# Altium PCB DC-Motor-Driver-v1.0.PcbDoc (part 1 of 5)
Units mil, origin at the board's own origin, x right, y up, seen from the top; angles counter-clockwise.
Board outline 1968.5 x 1574.8 mil, 4 copper layers (Top Layer, Signal 1, Signal 2, Bottom Layer), stack 62.055 mil thick; 133 components, 124 nets, 619 pads, 342 vias.
Unrouted connection lines stored in the file: 5.
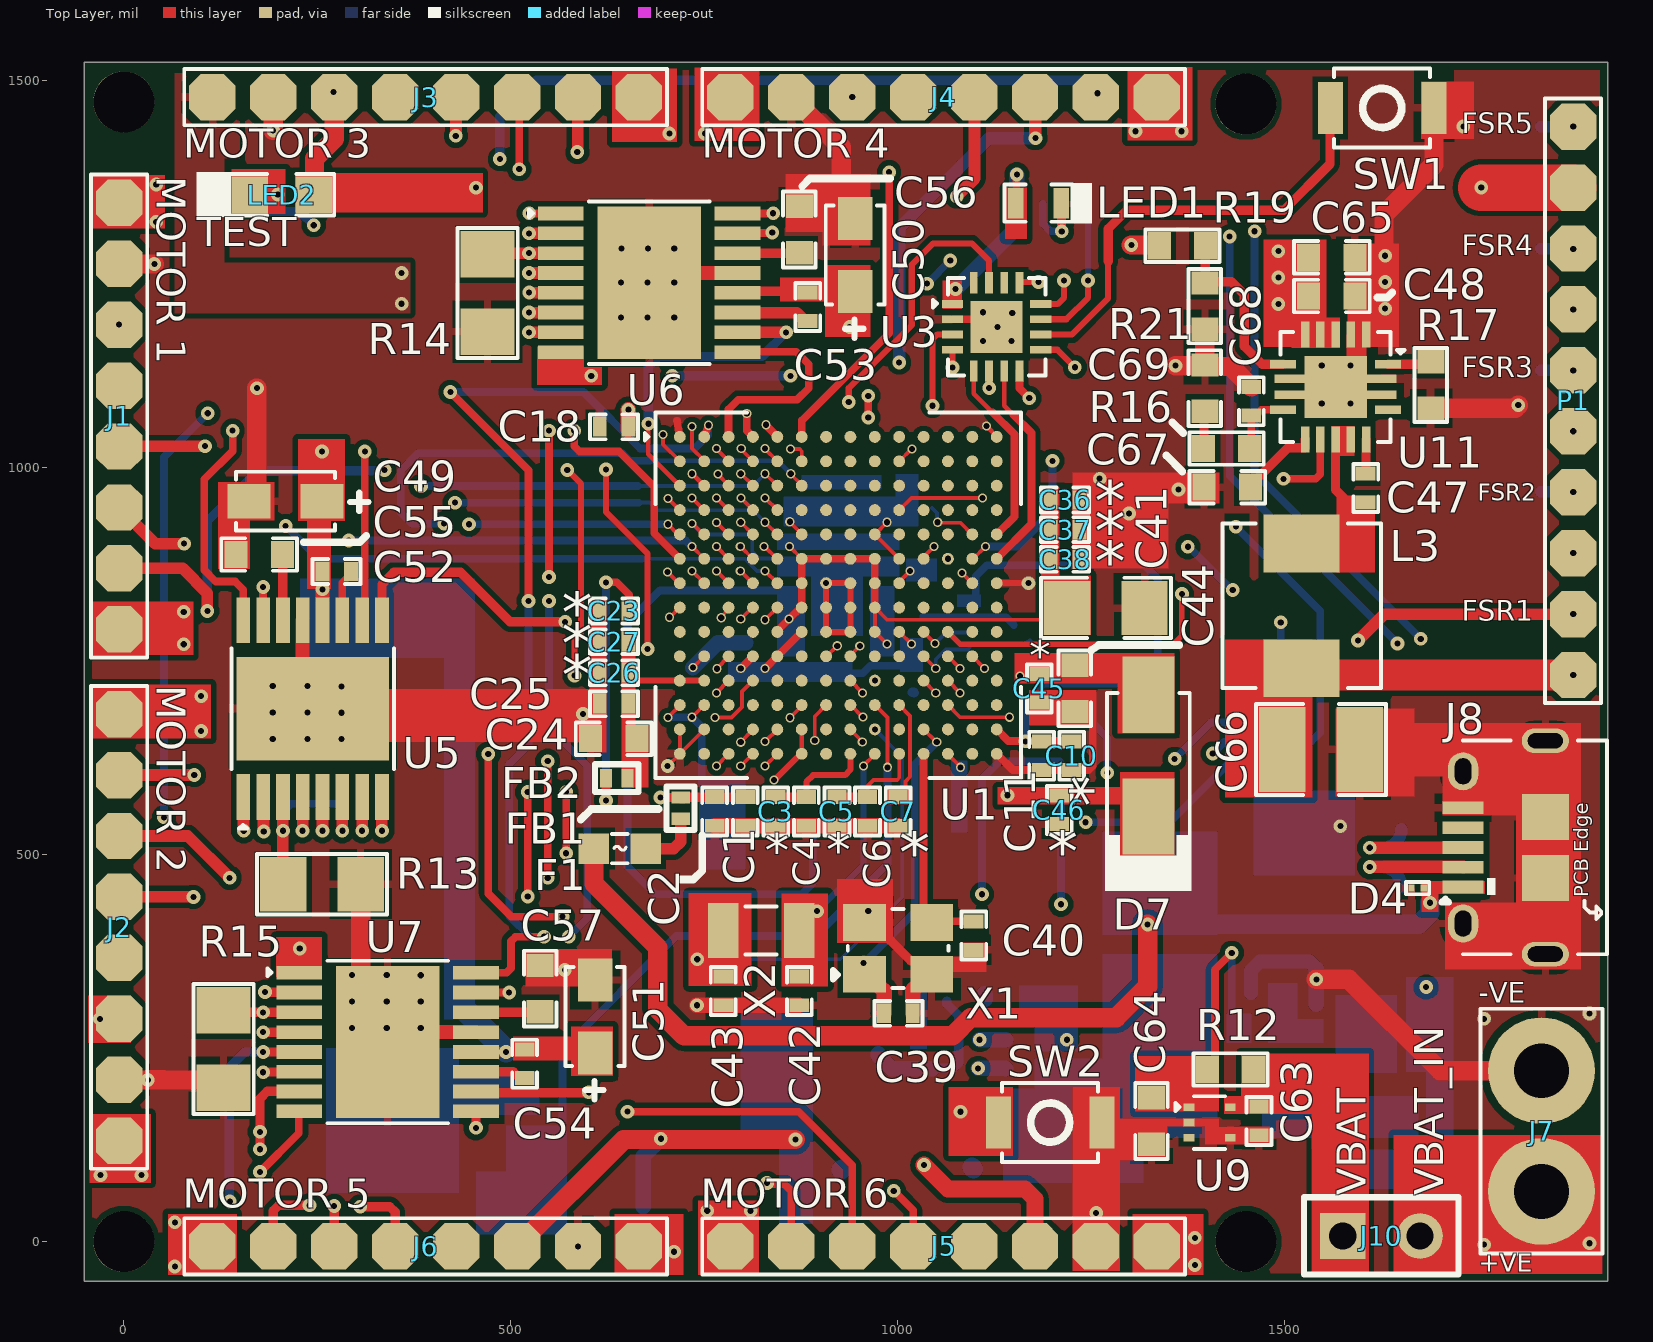
[diagram p0: Top Layer view]
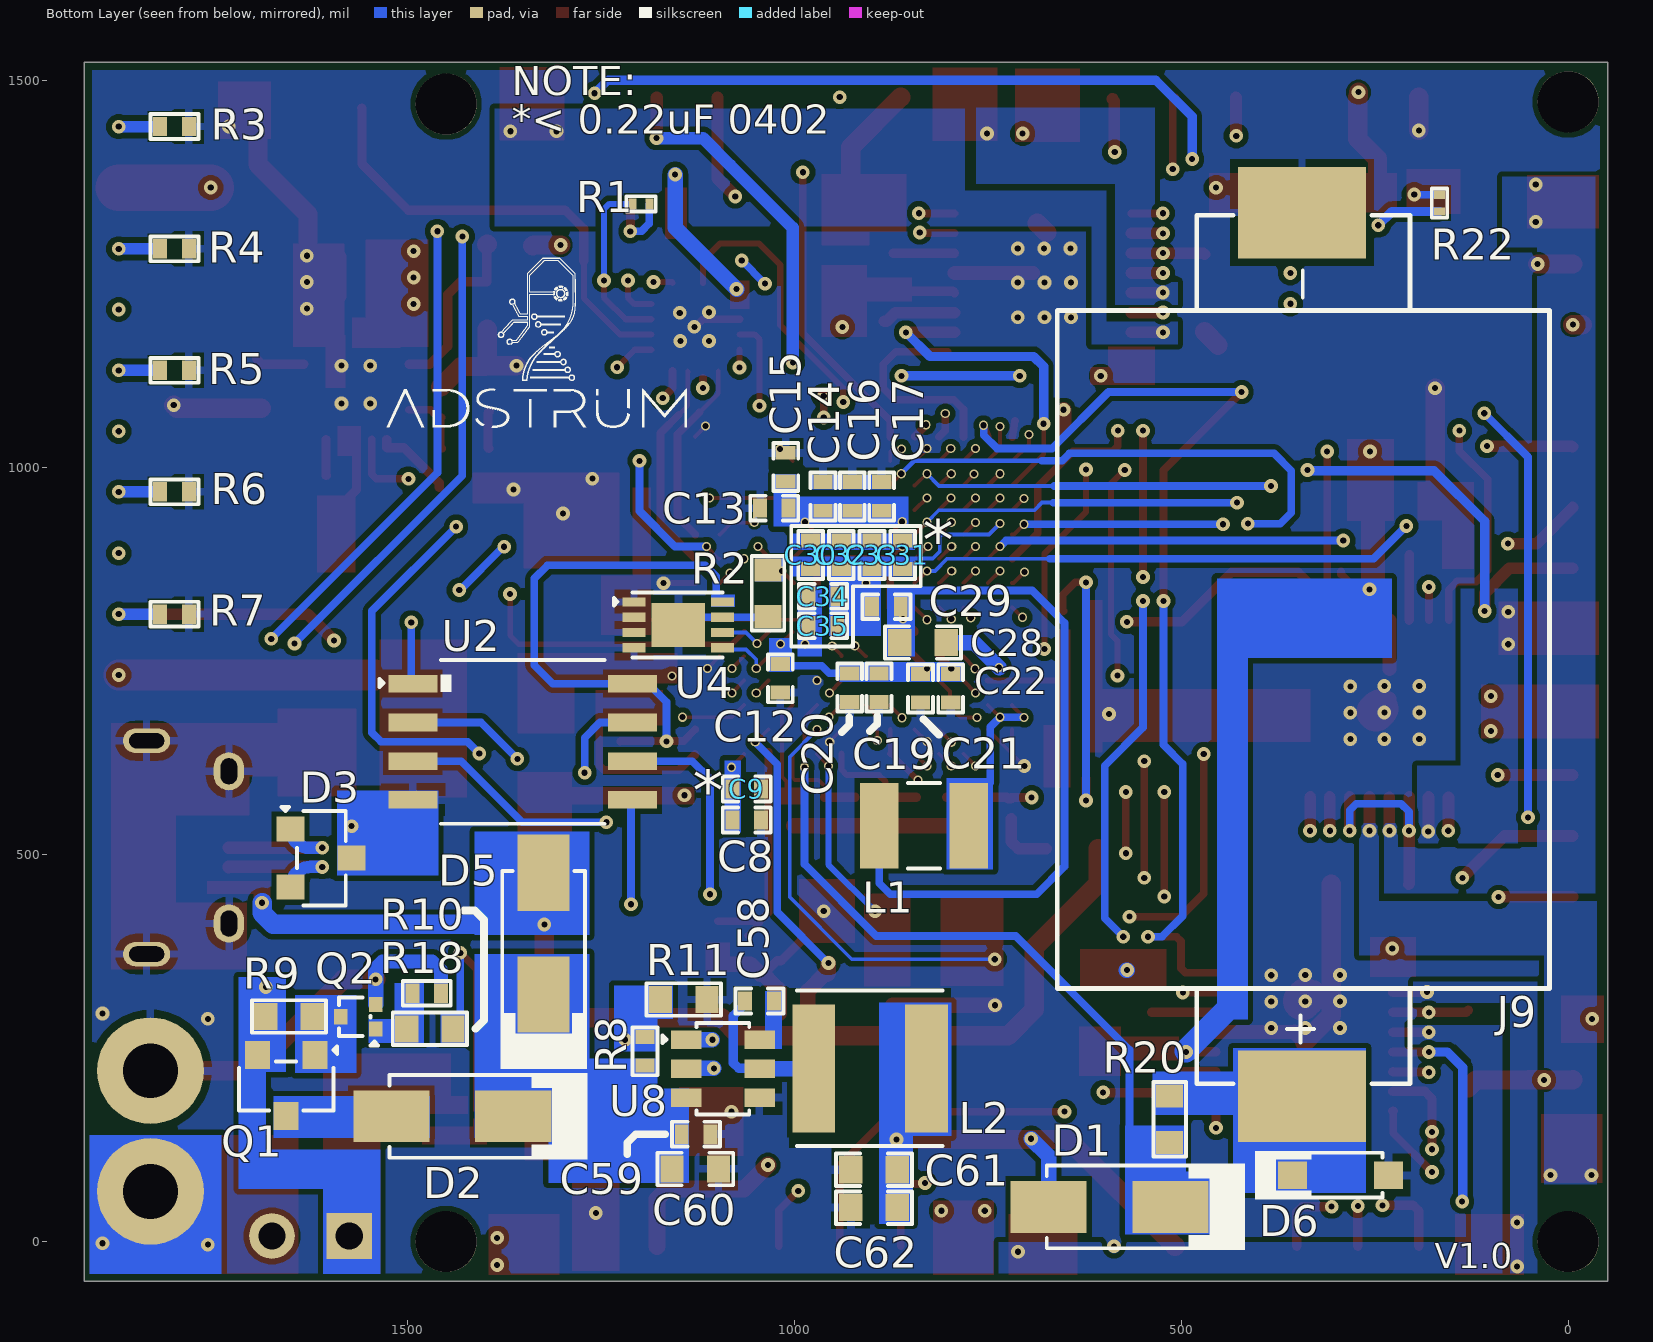
[diagram p1: Bottom Layer view, seen from below]
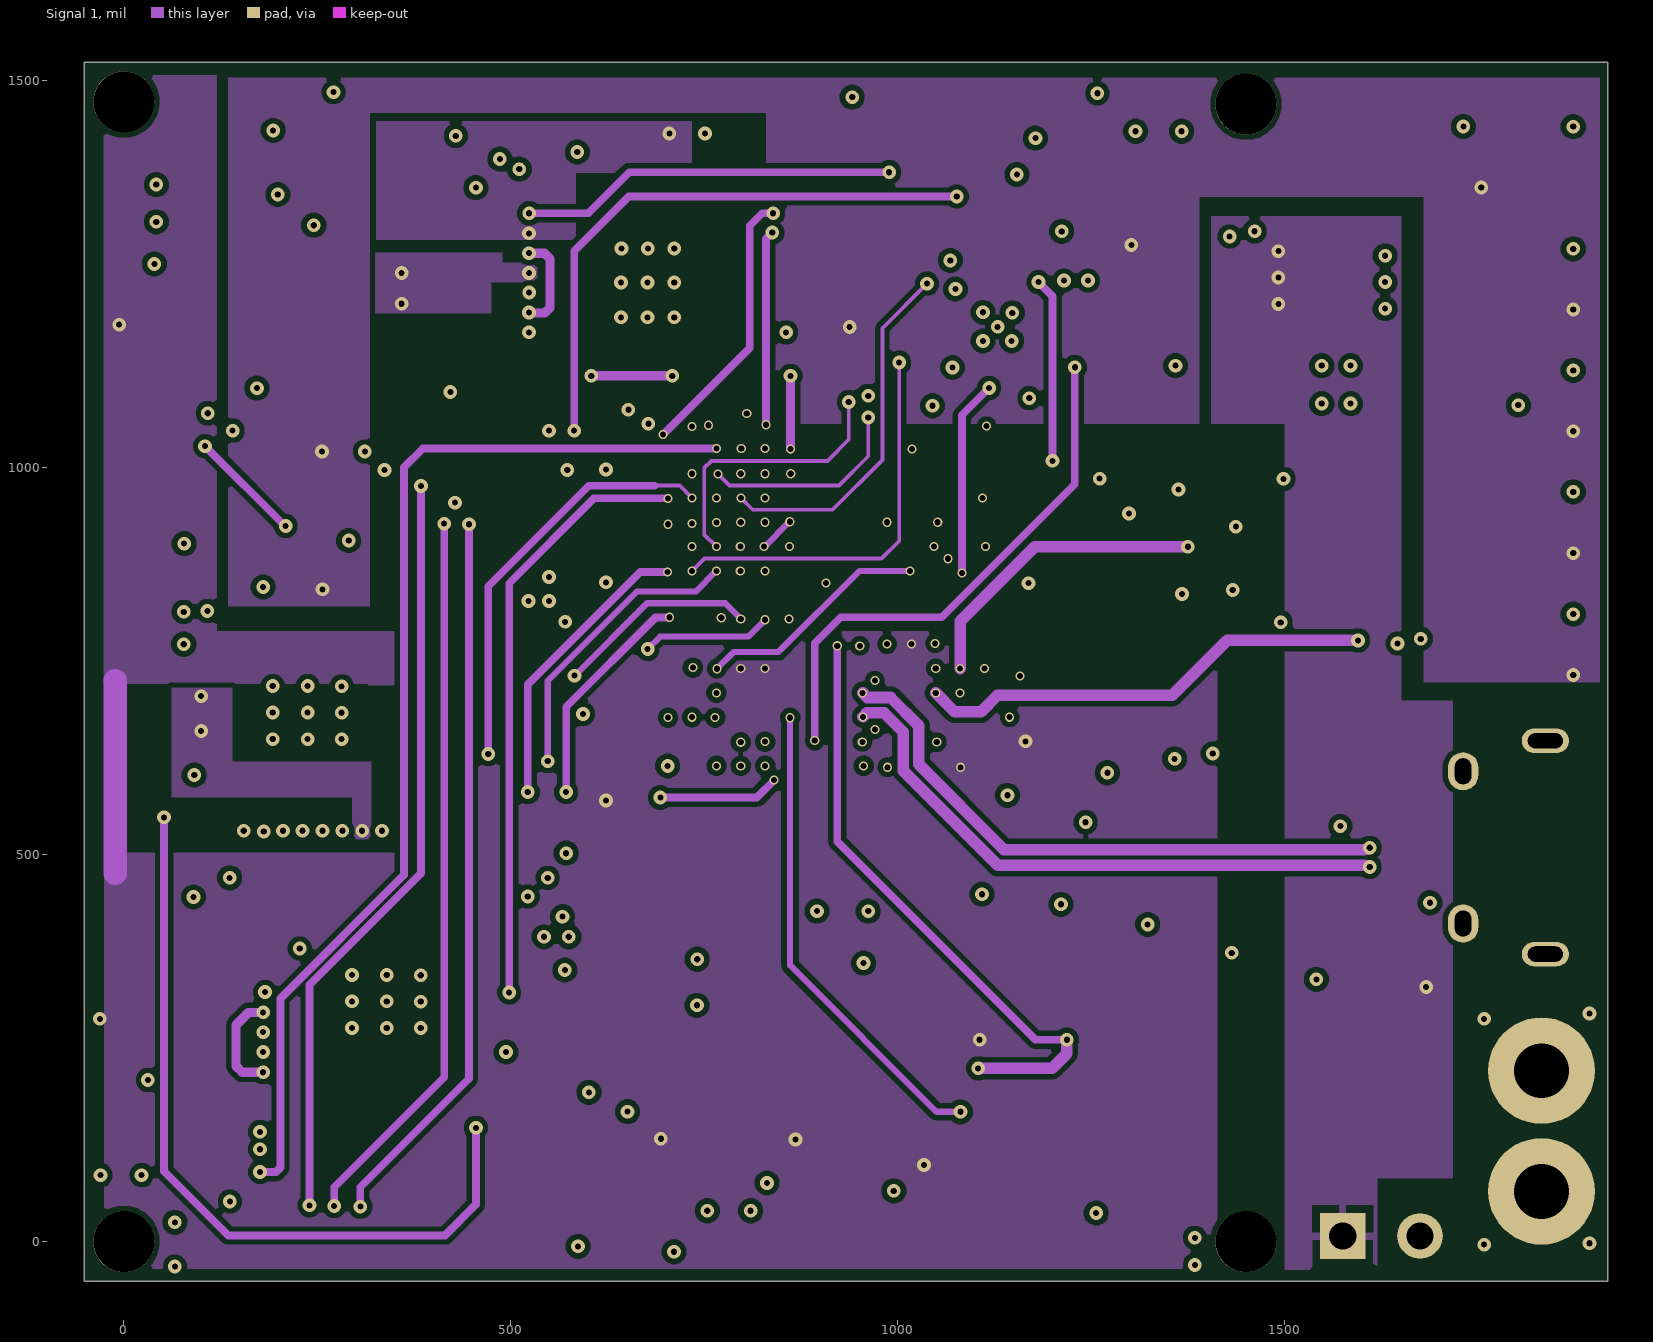
[diagram p2: Signal 1]
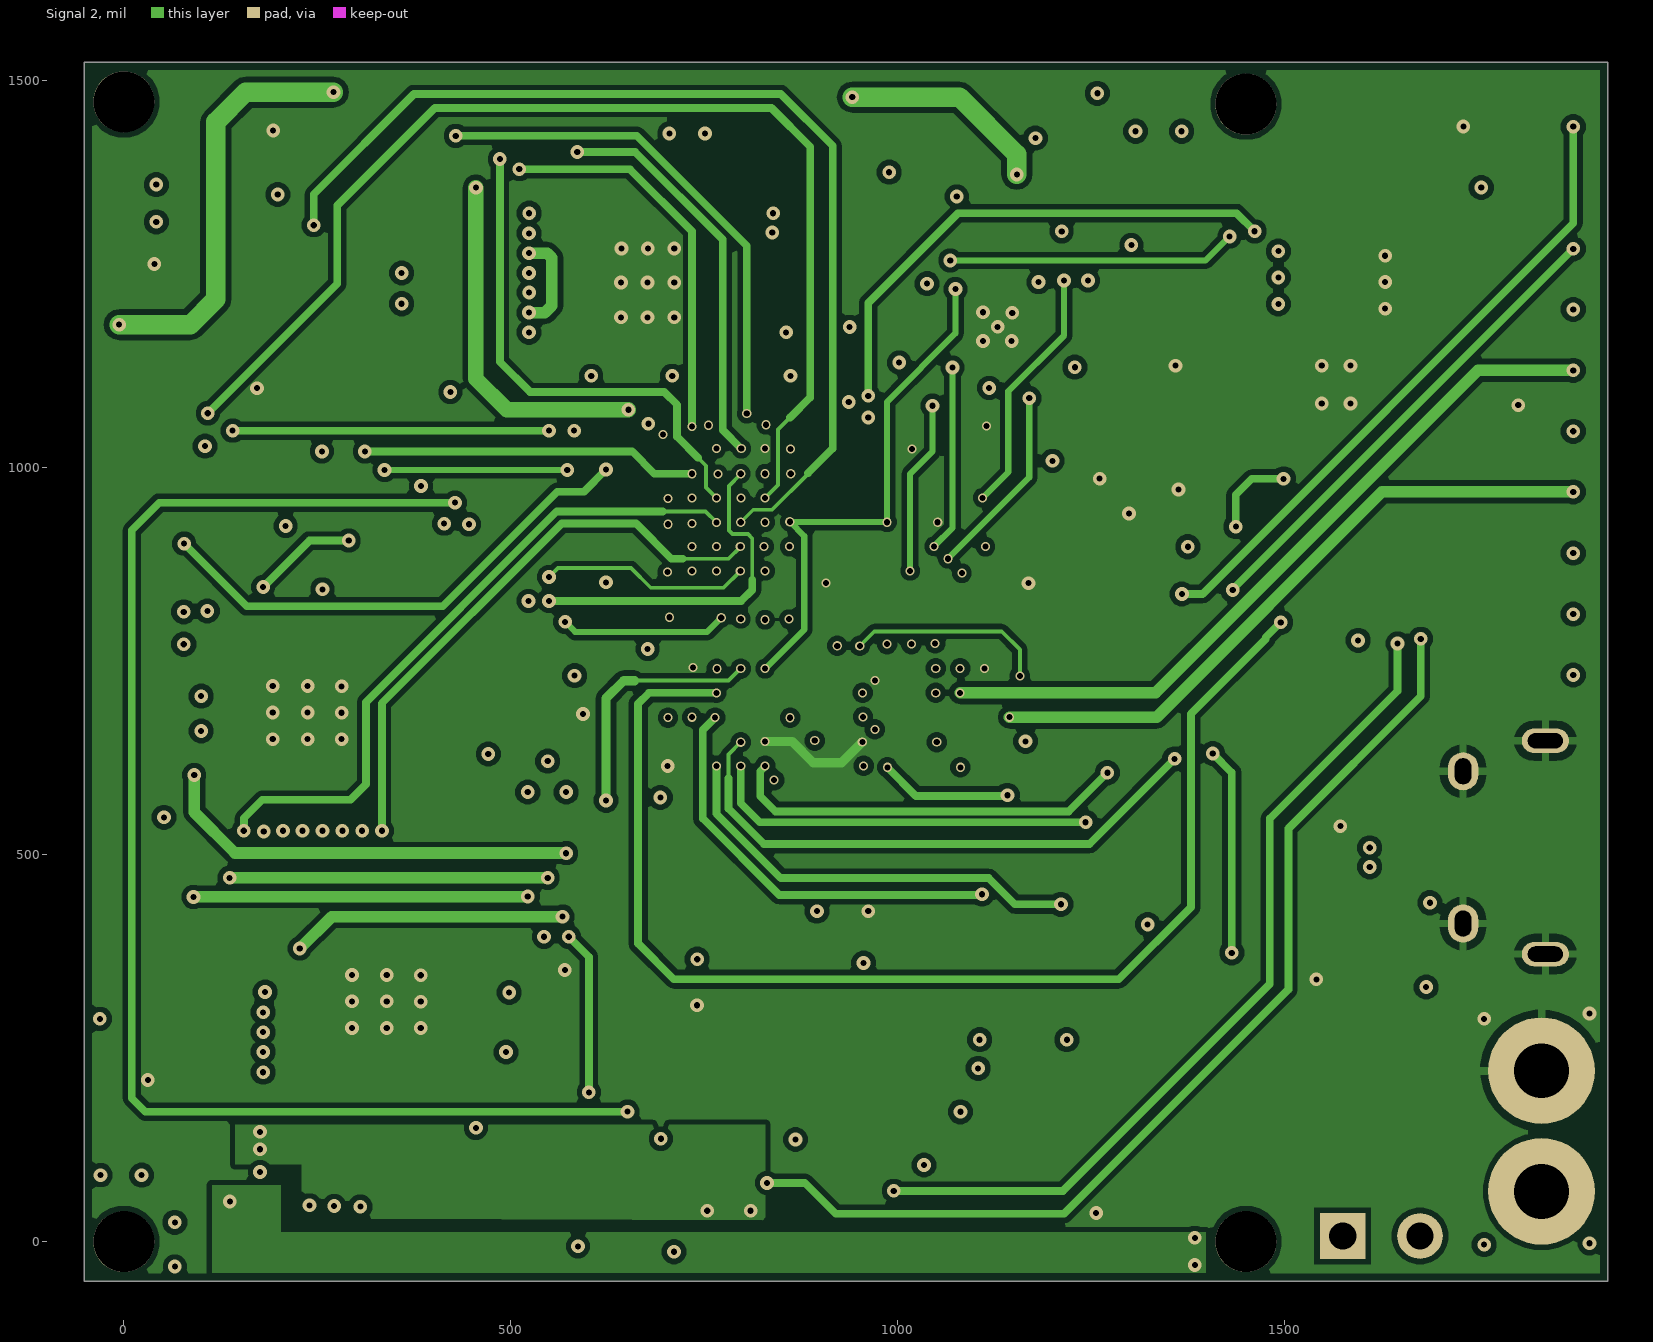
[diagram p3: Signal 2]

## Layer stack, top to bottom
Top Solder: solder mask 0.5, Solder Resist, Dk 3.5
Top Layer: signal copper 1.1811
Dielectric 2: prepreg 8.2835, PP-006, Dk 4.1
Signal 1: signal copper 0.5984
Dielectric 1: core 41.9291, FR-4, Dk 4.8
Signal 2: signal copper 0.5984
Dielectric 3: prepreg 8.2835, PP-006, Dk 4.1
Bottom Layer: signal copper 1.1811
Bottom Solder: solder mask 0.5, Solder Resist, Dk 3.5

## Board outline
-51,-50.8 -51,1524 1917.5,1524 1917.5,-50.8

## Design rules (kind name [scope] priority, off if disabled: settings)
BoardOutlineClearance [All] p1: gap=0 ignorepadtopadclearanceinfootprint=FALSE except(10: Poly-OutlineEdge)
Clearance Clearance_1 [All] p1: gap=7 ignorepadtopadclearanceinfootprint=FALSE except(4: Arc-Arc Arc-Track Arc-SMDPad Arc-THPad Track-Track Track-SMDPad Track-THPad SMDPad-SMDPad SMDPad-THPad THPad-THPad)
Clearance Clearance_BGA [WithinRoom('BGA')] p2: gap=3 ignorepadtopadclearanceinfootprint=FALSE
DiffPairsRouting [All] p1: maxlimit=5 minlimit=5 mostfreqgap=5 toplayer_minwidth=16 toplayer_maxwidth=16 toplayer_prefwidth=16 bottomlayer_minwidth=16 bottomlayer_maxwidth=16 bottomlayer_prefwidth=16 impedanceprofiledriven=TRUE impedanceprofileid={C171A0CF-75CA-4105-AF21-8C6E3F260B6E} impedanceprofilevalue=90.000000 maxuncoupledlength=500
HoleToHoleClearance [All] p1: gap=0 allowstackedmicrovias=TRUE
MatchedLengths "Schematic Matched Net Lengths" [InNetClass('GSM_USB')] p1: tolerance=50 checknetsindiffpair=TRUE checkdiffpairvsdiffpair=FALSE checkxsignals=FALSE checkothers=FALSE
MaxMinImpedance "Schematic Impedance Constraint" [InNetClass('GSM_USB')] p1: minimum=85.00 maximum=90.00
MinimumSolderMaskSliver [All] p1: minsoldermaskwidth=0
PolygonConnect [All] p1: thpad.connectstyle=Relief thpad.reliefconductorwidth=10 thpad.reliefentries=4 thpad.polygonreliefangle="90 Angle" thpad.airgapwidth=10 smdpad.connectstyle=Relief smdpad.reliefconductorwidth=10 smdpad.reliefentries=4 smdpad.polygonreliefangle="90 Angle" smdpad.airgapwidth=10 via.connectstyle=Direct via.reliefconductorwidth=10 via.reliefentries=4 via.polygonreliefangle="90 Angle" via.airgapwidth=10
RoutingVias RoutingVias_BGA [WithinRoom('BGA')] p1: holewidth=7.87 width=11.81 viastyle="Through Hole" minholewidth=7.87 minwidth=11.81 maxholewidth=7.87 maxwidth=11.81
RoutingVias [All] p2: holewidth=7.87 width=17.72 viastyle="Through Hole" minholewidth=7.87 minwidth=17.72 maxholewidth=7.87 maxwidth=17.72
SilkToSilkClearance [All] p1: silktosilkclearance=0
SilkToSolderMaskClearance [IsPad] p1: minsilkscreentomaskgap=0 clearancetoexposedcopper=TRUE
SolderMaskExpansion [All] p1: expansion=4 istentingtop=FALSE
Width [All] p1: maxlimit=100 minlimit=5 preferedwidth=10 minimp=50.000000 maximp=50.000000 favimp=50.000000
Width Width_BGA [WithinRoom('BGA')] p2: maxlimit=5 minlimit=3 preferedwidth=3 toplayer_prefwidth=5 midlayer1_maxwidth=3 midlayer2_maxwidth=3 bottomlayer_maxwidth=3 minimp=50.000000 maximp=50.000000 favimp=50.000000
25 further rules are at their usual default settings.

## Classes and differential pairs
differential pair class GSM_USB_Lines: USB_D
net class GSM_USB: USB_D_N USB_D_P
component class Power_Section: C47 C48 C58 C59 C60 C61 C62 C63 C64 C65 C66 C67 C68 C69 D2 D3 D4 D5 J7 J8 J10 L2 L3 Q1 Q2 R8 R9 R10 R11 R12 R16 R17 R18 R19 R21 U8 U9 U11
component class Motor_Section: C49 C50 C51 C52 C53 C54 C55 C56 C57 J1 J2 J3 J4 J5 J6 LED2 P1 R3 R4 R5 R6 R7 R13 R14 R15 R22 U5 U6 U7
component class Controller_Section: C1 C2 C3 C4 C5 C6 C7 C8 C9 C10 C11 C12 C13 C14 C15 C16 C17 C18 C19 C20 C21 C22 C23 C24 C25 C26 C27 C28 C29 C30 C31 C32 C33 C34 C35 C36 C37 C38 C39 C40 C41 C42 C43 C44 C45 C46 D1 D6 D7 F1 FB1 FB2 J9 L1 LED1 R1 R2 R20 SW1 SW2 U1 U2 U3 U4 X1 X2
differential pair USB_D: +USB_D_P -USB_D_N

## Components (designator, comment, footprint, x,y, rotation, side; value= is the part's Value field where it differs from the comment)
C1 "1uF" Cap-0402 803.04,556 r90 top locked
C2 "1uF" Cap-0402 763.54,556 r90 top locked
C3 "0.22uF" Cap-0402 842.54,556 r90 top locked
C4 "4.7uF" Cap-0402 882.04,556 r90 top locked
C5 "0.22uF" Cap-0402 921.54,556 r90 top locked
C6 "4.7uF" Cap-0402 961.04,556 r90 top locked
C7 "0.22uF" Cap-0402 1000.54,556 r90 top locked
C8 "4.7uF" Cap-0402 1061.5,545 r0 bottom locked
C9 "0.22uF" Cap-0402 1061.5,585 r0 bottom locked
C10 "0.22uF" Cap-0402 1225,628 r90 top locked
C11 "1uF" Cap-0402 1186,628 r90 top locked
C12 "0.1uF" Cap-0402 1018,728 r90 bottom locked
C13 "0.1uF" Cap-0402 1026,948 r180 bottom locked
C14 "0.1uF" Cap-0402 963,963 r270 bottom locked
C15 "4.7uF" Cap-0402 1011,1001 r270 bottom locked
C16 "0.1uF" Cap-0402 925.11,963 r270 bottom locked
C17 "0.1uF" Cap-0402 887.23,963 r270 bottom locked
C18 "4.7uF" Cap-0402 633.54,1053 r0 top locked
C19 "0.1uF" Cap-0402 890.61,716 r90 bottom locked
C20 "4.7uF" Cap-0402 928.46,716 r90 bottom locked
C21 "0.1uF" Cap-0402 837,715 r90 bottom locked
C22 "4.7uF" Cap-0402 798.03,715 r90 bottom locked
C23 "0.22uF" Cap-0402 633.54,815 r0 top locked
C24 "22uF" Cap-0603 633,650 r0 top locked
C25 "4.7uF" Cap-0402 633.54,695 r180 top locked
C26 "0.22uF" Cap-0402 633.54,735.1 r0 top locked
C27 "0.22uF" Cap-0402 633.54,775.2 r0 top locked
C28 "22uF" Cap-0603 833.78,774.24 r0 bottom locked
C29 "4.7uF" Cap-0402 881.02,820.49 r0 bottom locked
C30 "0.22uF" Cap-0402 979,887.5 r90 bottom locked
C31 "0.22uF" Cap-0402 860,887.5 r90 bottom locked
C32 "0.22uF" Cap-0402 939.33,887.5 r90 bottom locked
C33 "0.22uF" Cap-0402 899.67,887.5 r90 bottom locked
C34 "0.22uF" Cap-0402 962.99,834.01 r0 bottom locked
C35 "0.22uF" Cap-0402 962.99,796.01 r0 bottom locked
C36 "0.22uF" Cap-0402 1216.37,958.49 r180 top locked
C37 "0.22uF" Cap-0402 1216.37,920.06 r180 top locked
C38 "0.22uF" Cap-0402 1216.37,881.63 r180 top locked
C39 "12pF" Cap-0402 1001,295 r0 top locked
C40 "12pF" Cap-0402 1098.54,395.5 r270 top locked
C41 "33uF" Cap-1206 1269,819 r180 top locked
C42 "12pF" Cap-0402 873.04,324 r270 top locked
C43 "12pF" Cap-0402 774.54,324 r270 top locked
C44 "10uF" Cap-0603 1229,715 r90 top locked
C45 "0.22uF" Cap-0402 1183,715 r90 top locked
C46 "0.22uF" Cap-0402 1209,558 r90 top locked
C47 "0.1uF" Cap-0402 1605,974 r90 top locked
C48 "10uF" Cap-0603 1561,1222 r180 top locked
C49 "10uF" Case-A 209,957 r180 top locked
C50 "10uF" Case-A 945,1275 r90 top locked
C51 "10uF" Case-A 609,291 r90 top locked
C52 "0.01uF" Cap-0402 275,866 r180 top locked
C53 "0.01uF" Cap-0402 884,1208 r90 top locked
C54 "0.01uF" Cap-0402 518,230 r90 top locked
C55 "2.2uF" CAP-0603 175,888 r0 top locked
C56 "2.2uF" CAP-0603 873,1308 r270 top locked
C57 "2.2uF" CAP-0603 538,327 r270 top locked
C58 "0.1uF" Cap-0402 1045,311 r180 bottom locked
C59 "0.1uF" Cap-0402 1127,139 r0 bottom locked
C60 "10uF" Cap-0603 1128,94 r0 bottom locked
C61 "22uF" Cap-0603 897,93 r180 bottom locked
C62 "22uF" Cap-0603 897,44 r180 bottom locked
C63 "1uF" Cap-0402 1467,156 r90 top locked
C64 "1nF" CAP-0603 1328,156 r90 top locked
C65 "4.7uF" Cap-0603 1561,1272 r180 top locked
C66 "47uF" Cap-1210 1547,636 r180 top locked
C67 "2.2nF" Cap-0603 1426,975 r0 top locked
C68 "33pF" Cap-0402 1457,1086 r270 top locked
C69 "22nF" Cap-0603 1397,1103 r270 top locked
D1 "SS16" SMA 592.74,45 r0 bottom locked
D2 "SS36" SMA 1442,162 r0 bottom locked
D3 "ESD5302F-3/TR" Sot-23 1611.63,495.6 r270 bottom locked
D4 "PESD5V0H1BSFYL" DSN0603-2 1672,457 r0 top locked
D5 "SS36" SMA 1324,398 r90 bottom locked
D6 "LBZT52B3V0T1G" SOD-123 294,86 r0 bottom locked
D7 "SS16" SMA 1324,628 r90 top locked
F1 "SMD0603-050" Fuse-0603 641,508 r0 top locked
FB1 "BLM15PD121SN1D" IND-0402 719.54,560.22 r90 top locked
FB2 "BLM15PD121SN1D" IND-0402 637,599 r0 top locked
J1 "SMD PADS (1x8) 2.54mm" "SMD PADS (1X8) 2.54MM" -6,1342.48 r270 top locked
J2 "SMD PADS (1x8) 2.54mm" "SMD PADS (1X8) 2.54MM" -6,130.56 r90 top locked
J3 "SMD PADS (1x8) 2.54mm" "SMD PADS (1X8) 2.54MM" 114.52,1479 r0 top locked
J4 "SMD PADS (1x8) 2.54mm" "SMD PADS (1X8) 2.54MM" 783.82,1479 r0 top locked
J5 "SMD PADS (1x8) 2.54mm" "SMD PADS (1X8) 2.54MM" 1335,-6 r180 top locked
J6 "SMD PADS (1x8) 2.54mm" "SMD PADS (1X8) 2.54MM" 665.7,-6 r180 top locked
J7 "DNP" "Through Hole Pads 2" 1832,142.95 r90 top locked
J8 "10118194-0001LF" 10118194-0001LF_ 1730.7,509.44 r90 top locked
J9 "CR2032-BS-6-1" CR2032-BS-6-1 344,759 r270 bottom locked
J10 "826629-2" HDR1X2_ 1575,7.39 r0 top locked
L1 "4.7uH" IND-1210 832.46,537.5 r180 bottom locked
L2 "3.9uH" SWPA5020S3R9NT 902.13,224 r180 bottom locked
L3 "2.2uH" PSPMAA0503-2R2M-ANP 1522,821.61 r270 top locked
LED1 "RED" LED-0603 1182,1342 r0 top locked
LED2 "Orange" LED-0805 204,1353 r180 top locked
P1 "SMD PADS (1x10) 2.54mm" "SMD PADS (1x10) 2.54mm" 1768,799.26 r90 top locked
Q1 "AO3407" SOT-23 1656.6,201.63 r0 bottom locked
Q2 "MMBT3904M" SOT-723 1563.64,290.75 r90 bottom locked
R1 "470R" Res-0201 1198.17,1341 r0 bottom locked
R2 "100K" Res-0603 1034,838 r90 bottom locked
R3 "2.87k" Res-0402 1801,1441 r0 bottom locked
R4 "2.87k" Res-0402 1801,1283 r0 bottom locked
R5 "2.87k" Res-0402 1801,1126 r0 bottom locked
R6 "2.87k" Res-0402 1801,969 r0 bottom locked
R7 "2.87k" Res-0402 1801,811 r0 bottom locked
R8 "10K" Res-0402 1193,246 r270 bottom locked
R9 "1K" Res-0603 1653,291 r180 bottom locked
R10 "4.7K" Res-0603 1471,275 r0 bottom locked
R11 "4.7K" Res-0603 1143,313 r0 bottom locked
R12 "4.7K" Res-0603 1430.25,222.45 r0 top locked
R13 "330mR" Res-1206 256,462 r180 top locked
R14 "330mR" Res-1206 470,1226 r90 top locked
R15 "330mR" Res-1206 129,249 r90 top locked
R16 "3.9K" Res-0603 1425,1025 r0 top locked
R17 "56K" Res-0603 1689,1107 r90 top locked
R18 "10K" Res-0402 1475,321 r0 bottom locked
R19 "649K" Res-0603 1368,1287 r180 top locked value=649kR
R20 "100R" Res-0603 514.97,158.13 r90 bottom locked
R21 "100K" Res-0603 1397,1209 r90 top locked
R22 "470R" Res-0201 166.32,1342.14 r90 bottom locked
SW1 "B3U-1000P" B3U-1000P 1626.07,1465 r180 top locked
SW2 "B3U-1000P" B3U-1000P 1197,154 r180 top locked
U1 "MIMXRT1062DVJ6B" "196-LFBGA (12x12)" 923.27,835.24 r0 top locked
U2 "W25Q64JVSSIM" "SOIC-8 (208 mil)" 1351,646 r180 bottom locked
U3 "MKL02Z32VFG4" "16-QFN (3x3)." 1127.91,1182.16 r0 top locked
U4 "M24C64-FMC6TG" DFN-8-EP(2x3) 1150,797 r180 bottom locked
U5 "DRV8833PWPR" HTSSOP-16 244,688.83 r90 top locked
U6 "DRV8833PWPR" HTSSOP-16 678.83,1239 r0 top locked
U7 "DRV8833PWPR" HTSSOP-16 340.83,258 r0 top locked
U8 "AP63203WU-7" TSOT-23-6 1092.24,223.4 r180 bottom locked
U9 "BD4860FVE-TR" "VSOF 5" 1403,154 r0 top locked
U11 "TPS54620RHLR" "14-VQFN (3.5X3.5)_" 1565.91,1104.47 r270 top locked
X1 "24MHZ" X322524MOB4SI- 1000.54,379 r0 top locked
X2 "32.7680KHZ" NX3215SA-32.768K-STD-MUA-8_ 823.54,402 r0 top locked

## Footprints (in the part's own frame and the unit in brackets; to place one, negate y for a bottom-side part, rotate by r counter-clockwise, add the part's x,y. Pads: shape width x height; smd on the part's side, far side on the other; paste and mask are expansions set on the pad)
"14-VQFN (3.5X3.5)_" [mm]
  rect 0.28x0.85 smd: 1(-0.75,1.725) 7(-0.75,-1.725) 8(0.75,-1.725) 14(0.75,1.725)
  rect 0.85x0.28 smd: 2(-1.725,1) 3(-1.725,0.5) 4(-1.725,0) 5(-1.725,-0.5) 6(-1.725,-1) 9(1.725,-1) 10(1.725,-0.5) 11(1.725,0) 12(1.725,0.5) 13(1.725,1)
  rect 0.28x1 smd mask+0.055: 15(-0.267,1.5) 15(-0.267,-1.5) 15(0.254,1.499) 15(0.254,-1.499)
  rect 2.05x2.05 smd: 15(0,0)
  silkscreen extent -1.8,-1.8 1.8,2.26, body extent -1.75,-1.75 1.75,1.75, height 1
"16-QFN (3x3)." [mm]
  rect 0.7x0.25 smd: 1(-1.45,0.75) 2(-1.45,0.25) 3(-1.45,-0.25) 4(-1.45,-0.75) 9(1.45,-0.75) 10(1.45,-0.25) 11(1.45,0.25) 12(1.45,0.75)
  rect 0.25x0.7 smd: 5(-0.75,-1.45) 6(-0.25,-1.45) 7(0.25,-1.45) 8(0.75,-1.45) 13(0.75,1.45) 14(0.25,1.45) 15(-0.25,1.45) 16(-0.75,1.45)
  rect 1.7x1.7 smd: 17(0,0)
  silkscreen extent -2.08,-1.6 1.6,1.6, body extent -1.55,-1.55 1.55,1.55, height 0.99
"196-LFBGA (12x12)" [mm]
  round 0.39 smd: A1(-5.2,5.2) A2(-4.4,5.2) A3(-3.6,5.2) A4(-2.8,5.2) A5(-2,5.2) A6(-1.2,5.2) A7(-0.4,5.2) A8(0.4,5.2) A9(1.2,5.2) A10(2,5.2) A11(2.8,5.2) A12(3.6,5.2) A13(4.4,5.2) A14(5.2,5.2) B1(-5.2,4.4) B2(-4.4,4.4) B3(-3.6,4.4) B4(-2.8,4.4) B5(-2,4.4) B6(-1.2,4.4) B7(-0.4,4.4) B8(0.4,4.4) B9(1.2,4.4) B10(2,4.4) B11(2.8,4.4) B12(3.6,4.4) B13(4.4,4.4) B14(5.2,4.4) C1(-5.2,3.6) C2(-4.4,3.6) C3(-3.6,3.6) C4(-2.8,3.6) C5(-2,3.6) C6(-1.2,3.6) C7(-0.4,3.6) C8(0.4,3.6) C9(1.2,3.6) C10(2,3.6) C11(2.8,3.6) C12(3.6,3.6) C13(4.4,3.6) C14(5.2,3.6) D1(-5.2,2.8) D2(-4.4,2.8) D3(-3.6,2.8) D4(-2.8,2.8) D5(-2,2.8) D6(-1.2,2.8) D7(-0.4,2.8) D8(0.4,2.8) D9(1.2,2.8) D10(2,2.8) D11(2.8,2.8) D12(3.6,2.8) D13(4.4,2.8) D14(5.2,2.8) E1(-5.2,2) E2(-4.4,2) E3(-3.6,2) E4(-2.8,2) E5(-2,2) E6(-1.2,2) E7(-0.4,2) E8(0.4,2) E9(1.2,2) E10(2,2) E11(2.8,2) E12(3.6,2) E13(4.4,2) E14(5.2,2) F1(-5.2,1.2) F2(-4.4,1.2) F3(-3.6,1.2) F4(-2.8,1.2) F5(-2,1.2) F6(-1.2,1.2) F7(-0.4,1.2) F8(0.4,1.2) F9(1.2,1.2) F10(2,1.2) F11(2.8,1.2) F12(3.6,1.2) F13(4.4,1.2) F14(5.2,1.2) G1(-5.2,0.4) G2(-4.4,0.4) G3(-3.6,0.4) G4(-2.8,0.4) G5(-2,0.4) G6(-1.2,0.4) G7(-0.4,0.4) G8(0.4,0.4) G9(1.2,0.4) G10(2,0.4) G11(2.8,0.4) G12(3.6,0.4) G13(4.4,0.4) G14(5.2,0.4) H1(-5.2,-0.4) H2(-4.4,-0.4) H3(-3.6,-0.4) H4(-2.8,-0.4) H5(-2,-0.4) H6(-1.2,-0.4) H7(-0.4,-0.4) H8(0.4,-0.4) H9(1.2,-0.4) H10(2,-0.4) H11(2.8,-0.4) H12(3.6,-0.4) H13(4.4,-0.4) H14(5.2,-0.4) J1(-5.2,-1.2) J2(-4.4,-1.2) J3(-3.6,-1.2) J4(-2.8,-1.2) J5(-2,-1.2) J6(-1.2,-1.2) J7(-0.4,-1.2) J8(0.4,-1.2) J9(1.2,-1.2) J10(2,-1.2) J11(2.8,-1.2) J12(3.6,-1.2) J13(4.4,-1.2) J14(5.2,-1.2) K1(-5.2,-2) K2(-4.4,-2) K3(-3.6,-2) K4(-2.8,-2) K5(-2,-2) K6(-1.2,-2) K7(-0.4,-2) K8(0.4,-2) K9(1.2,-2) K10(2,-2) K11(2.8,-2) K12(3.6,-2) K13(4.4,-2) K14(5.2,-2) L1(-5.2,-2.8) L2(-4.4,-2.8) L3(-3.6,-2.8) L4(-2.8,-2.8) L5(-2,-2.8) L6(-1.2,-2.8) L7(-0.4,-2.8) L8(0.4,-2.8) L9(1.2,-2.8) L10(2,-2.8) L11(2.8,-2.8) L12(3.6,-2.8) L13(4.4,-2.8) L14(5.2,-2.8) M1(-5.2,-3.6) M2(-4.4,-3.6) M3(-3.6,-3.6) M4(-2.8,-3.6) M5(-2,-3.6) M6(-1.2,-3.6) M7(-0.4,-3.6) M8(0.4,-3.6) M9(1.2,-3.6) M10(2,-3.6) M11(2.8,-3.6) M12(3.6,-3.6) M13(4.4,-3.6) M14(5.2,-3.6) N1(-5.2,-4.4) N2(-4.4,-4.4) N3(-3.6,-4.4) N4(-2.8,-4.4) N5(-2,-4.4) N6(-1.2,-4.4) N7(-0.4,-4.4) N8(0.4,-4.4) N9(1.2,-4.4) N10(2,-4.4) N11(2.8,-4.4) N12(3.6,-4.4) N13(4.4,-4.4) N14(5.2,-4.4) P1(-5.2,-5.2) P2(-4.4,-5.2) P3(-3.6,-5.2) P4(-2.8,-5.2) P5(-2,-5.2) P6(-1.2,-5.2) P7(-0.4,-5.2) P8(0.4,-5.2) P9(1.2,-5.2) P10(2,-5.2) P11(2.8,-5.2) P12(3.6,-5.2) P13(4.4,-5.2) P14(5.2,-5.2)
  silkscreen extent -6.35,-6 6,6, body extent -6,-6 6,6, height 1.58
10118194-0001LF_ [mm]
  rect 0.42x1.35 smd: 1(-1.3,0) 2(-0.65,0) 3(0,0) 4(0.65,0) 5(1.3,0)
  rect 1.5x1.55 smd: MP1(-1,-2.7) MP2(1,-2.7)
  oval 1.25x1 hole 0.55 slot 0.85 at 0 deg: S1(-2.5,0) S2(2.5,0)
  oval 0.8x1.55 hole 0.5 slot 1.15 at 90 deg: S3(3.5,-2.7) S4(-3.5,-2.7)
  Top Layer region: 193 vertices and 0 holes, not listed, extent 2.3,-3.48 4,-1.925
  Top Layer region: 193 vertices and 0 holes, not listed, extent -4,-3.475 -2.3,-1.92
  silkscreen extent -3.51,-4.72 3.51,0.71, body extent -4.02,-5.34 4.03,0.19, height 2.69
B3U-1000P [mm] "SWITCH TACTILE SPST-NO 0.05A 12V"
  rect 0.82x1.72 smd: 1(-1.7,0) 2(1.7,0)
  silkscreen extent -1.57,-1.3 1.57,1.3, body extent -2,-1.26 2,1.24, height 1.6
Cap-0402 [mil]
  rect 18x25 smd mask+2.36: 1(-18.5,0) 2(18.5,0)
  silkscreen extent -31,-16 31,16, body extent -20,-10 20,10, height 19
Cap-0603 [mil]
  rect 30x35 smd mask+2.36: 1(-30,0) 2(30,0)
  silkscreen extent -49,-21 49,21, body extent -32,-16 31,16, height 34
CAP-0603 [mil]
  rect 30x35 smd mask+2.36: 1(-30,0) 2(30,0)
  silkscreen extent -49,-21 49,21, body extent -32,-16 31,16, height 34
Cap-1206 [mil] "SMD 1206"
  rect 60x70 smd: 1(-50,0) 2(50,0)
  silkscreen extent -84,-39 84,39, body extent -63,-31 63,32, height 39
Cap-1210 [mil] "SMD 1210"
  rect 60x110 smd: 1(-50,0) 2(50,0)
  silkscreen extent -84,-59 84,59, body extent -63,-49 63,49, height 39
Case-A [mm]
  rect 1.42x1.13 smd: 1(-1.2,0) 2(1.2,0)
  silkscreen extent -2.72,-0.97 1.63,0.97, body extent -1.6,-0.9 1.6,0.9, height 1.8
CR2032-BS-6-1 [mm]
  rect 3x4.2 smd: 1(14.5,0) 2(-14.5,0)
  silkscreen extent -14.41,-8.03 14.09,8.12, body extent -15.65,-8 15.65,8, height 5.6
DFN-8-EP(2x3) [mm]
  rect 0.75x0.3 smd: 1(-1.45,0.75) 2(-1.45,0.25) 3(-1.45,-0.25) 4(-1.45,-0.75) 5(1.45,-0.75) 6(1.45,-0.25) 7(1.45,0.25) 8(1.45,0.75)
  rect 1.75x1.45 smd: 9(0,0)
  silkscreen extent -2.11,-1.07 1.45,1.07, body extent -1.5,-1 1.5,1, height 1
DSN0603-2 [mm]
  rect 0.2x0.24 smd mask+0.055: 1(-0.2,0) 2(0.2,0)
  silkscreen extent -0.38,-0.2 0.38,0.2, body extent -0.3,-0.15 0.3,0.15, height 0.32
Fuse-0603 [mm]
  rect 1x1 smd: 1(-0.85,0) 2(0.85,0)
  silkscreen extent -0.25,-0.48 0.25,0.48, body extent -0.77,-0.42 0.78,0.43, height 0.45
HDR1X2_ [mm] "CONN HEADER VERT 2POS 2.54MM"
  rect 1.5x1.5 hole 0.9: 1(0,0)
  round 1.5 hole 0.9: 2(2.54,0)
  silkscreen extent -1.27,-1.27 3.81,1.27, body extent -1.27,-1.27 3.81,1.27, height 8.44
HTSSOP-16 [mm]
  rect 1.5x0.45 smd: 1(-2.9,2.275) 2(-2.9,1.625) 3(-2.9,0.975) 4(-2.9,0.325) 5(-2.9,-0.325) 6(-2.9,-0.975) 7(-2.9,-1.625) 8(-2.9,-2.275) 9(2.9,-2.275) 10(2.9,-1.625) 11(2.9,-0.975) 12(2.9,-0.325) 13(2.9,0.325) 14(2.9,0.975) 15(2.9,1.625) 16(2.9,2.275)
  rect 3.4x5 smd: 17(0,0)
  silkscreen extent -3.94,-2.67 1.98,2.67, body extent -3.2,-2.5 3.2,2.5, height 1.2
IND-0402 [mm]
  rect 0.4x0.6 smd: 1(-0.35,0) 2(0.35,0)
  silkscreen extent -0.71,-0.46 0.71,0.46, body extent -0.5,-0.25 0.5,0.25, height 0.25
IND-1210 [mm]
  rect 1.27x2.81 smd: 1(-1.471,0) 2(1.471,0)
  silkscreen extent -0.52,-1.4 0.52,1.4, body extent -1.6,-1.4 1.6,1.4, height 2.5
LED-0603 [mm]
  rect 0.5x1 smd: 1(-0.75,0) 2(0.75,0)
  silkscreen extent -1.12,-0.66 1.75,0.66, body extent -0.82,-0.37 0.82,0.36, height 0.68
LED-0805 [mm]
  rect 1.2x1.2 smd: 1(-1.05,0) 2(1.05,0)
  silkscreen extent -1.73,-0.74 2.79,0.74, body extent -1,-0.62 1,0.63, height 1.1
NX3215SA-32.768K-STD-MUA-8_ [mm]
  rect 1x1.8 smd: 1(-1.25,0) 2(1.25,0)
  silkscreen extent -0.51,-0.79 0.51,0.79, body extent -1.6,-0.75 1.6,0.75, height 0.8
PSPMAA0503-2R2M-ANP [mm]
  rect 1.895x2.5 smd: 1(-2.047,0) 2(2.048,0)
  silkscreen extent -2.7,-2.6 2.7,2.6, body extent -2.7,-2.6 2.7,2.6, height 3.1
Res-0201 [mm]
  rect 0.27x0.37 smd mask+0.055: 1(-0.275,0) 2(0.275,0)
  silkscreen extent -0.48,-0.25 0.48,0.25, body extent -0.3,-0.15 0.3,0.15, height 0.29
Res-0402 [mil]
  rect 18x25 smd mask+2.17: 1(-18.5,0) 2(18.5,0)
  silkscreen extent -32,-17 32,16, body extent -23,-11 23,11, height 16
Res-0603 [mil]
  rect 30x35 smd: 1(-30,0) 2(30,0)
  silkscreen extent -48,-21 48,21, body extent -31,-17 31,17, height 18
Res-1206 [mil]
  rect 60x70 smd: 1(-50,0) 2(50,0)
  silkscreen extent -84,-39 84,39, body extent -63,-31 63,31, height 24
SMA [mm]
  rect 2.5x1.7 smd: 1(-2,0) 2(2,0)
  silkscreen extent -4.44,-1.42 2.06,1.42, body extent -2.6,-1.3 2.6,1.3, height 2.4
"SMD PADS (1X8) 2.54MM" [mil]
  oct 60x60 smd: 1(0,0) 2(78.74,0) 3(157.48,0) 4(236.22,0) 5(314.96,0) 6(393.7,0) 7(472.44,0) 8(551.18,0)
  silkscreen extent -36,-36 588,36
"SMD PADS (1x10) 2.54mm" [mil]
  oct 60x60 smd: 1(-67,-105) 2(11.74,-105) 3(90.48,-105) 4(169.22,-105) 5(247.96,-105) 6(326.7,-105) 7(405.44,-105) 8(484.18,-105) 9(562.92,-105) 10(641.66,-105)
  silkscreen extent -103,-141 678,-69
SOD-123 [mm]
  rect 0.95x0.9 smd: 1(-1.575,0) 2(1.575,0)
  silkscreen extent -1.37,-0.8 2.82,0.8, body extent -1.82,-0.77 1.83,0.78, height 1.5
"SOIC-8 (208 mil)" [mm]
  rect 1.61x0.58 smd: 1(-3.605,1.905) 2(-3.605,0.635) 3(-3.605,-0.635) 4(-3.605,-1.905) 5(3.605,-1.905) 6(3.605,-0.635) 7(3.605,0.635) 8(3.605,1.905)
  silkscreen extent -4.7,-2.69 2.69,2.69, body extent -3.95,-2.64 3.95,2.64, height 2.16
Sot-23 [mm] "TRANS NPN 40V 0.6A SOT23"
  rect 0.82x0.92 smd: 1(-0.95,-1) 2(0.95,-1) 3(0,1)
  silkscreen extent -1.68,-1.3 1.55,0.81, body extent -1.5,-1.25 1.5,1.25, height 1.05
SOT-23 [mm] "TRANS NPN 40V 0.6A SOT23"
  rect 0.82x0.92 smd: 1(-0.95,-1) 2(0.95,-1) 3(0,1)
  silkscreen extent -1.68,-1.3 1.55,0.81, body extent -1.5,-1.25 1.5,1.25, height 1.05
SOT-723 [mm]
  rect 0.5x0.45 smd: 1(-0.4,-0.575) 2(0.4,-0.575) 3(0,0.575)
  silkscreen extent -0.94,-0.66 0.64,0.64, body extent -0.6,-0.6 0.6,0.6, height 0.5
SWPA5020S3R9NT [mm]
  rect 1.4x4.2 smd: 1(-1.85,0) 2(1.85,0)
  silkscreen extent -2.4,-2.55 2.38,2.55, body extent -2.51,-2.5 2.51,2.5, height 2.12
"Through Hole Pads 2" [mm]
  round 3.5 hole 1.8: 1(-1.98,0) 2(1.98,0)
  silkscreen extent -4.01,-2.01 4.01,2.01
TSOT-23-6 [mm]
  rect 1x0.6 smd: 1(-1.2,0.95) 2(-1.2,0) 3(-1.2,-0.95) 4(1.2,-0.95) 5(1.2,0) 6(1.2,0.95)
  silkscreen extent -1.98,-1.5 0.86,1.5, body extent -1.41,-1.45 1.41,1.45, height 1
"VSOF 5" [mm]
  rect 0.35x0.25 smd: 1(-0.675,0.5) 2(-0.675,0) 3(-0.675,-0.5) 4(0.675,-0.5) 5(0.675,0.5)
  silkscreen extent -1.12,-0.86 0.51,0.86, body extent -0.8,-0.82 0.8,0.82, height 0.6
X322524MOB4SI- [mm]
  rect 1.4x1.2 smd: 1(-1.1,-0.85) 2(1.1,-0.85) 3(1.1,0.85) 4(-1.1,0.85)
  silkscreen extent -2.13,-1.3 1.65,1.3, body extent -1.6,-1.25 1.6,1.25, height 0.8

## Part data
C1 C2 C11 C63: library part CC0402KRX5R7BB105, "CAP CER 1UF 16V X5R 0402", Case Code (Imperial)=0402, Case Code (Metric)=1005, Dielectric=X5R, LCSC Part Number=C325464, Manufacturer=Yageo, Max Operating Temperature=85°C, Min Operating Temperature=-55°C, Supplier Part Number 1=311-1691-6-ND, Tolerance=10%, Voltage Rating=16V, Capacitance=1uF, Case/Package=0402, ComponentLink1Description=http://www.yageo.com/documents/recent/UPY-GPHC_X5R_4V-to-50V_12.pdf?src-supplier=Avnet+Europe, ComponentLink1URL=http://www.yageo.com/documents/recent/UPY-GPHC_X5R_4V-to-50V_12.pdf?src-supplier=Avnet+Europe, Composition=Ceramic, Depth=0.5mm, Halogen Free="Halogen Free", Height=0.5mm, Item Type=Capacitor, Lead Free="Lead Free", Length=1mm, Manufacturer Part Number=CC0402KRX5R7BB105, Mount="Surface Mount", Packaging="Tape and Reel", Pricing 1="1=0.36, 10=0.252, 100=0.1512, 500=0.1134, 1000=0.09576, 2500=0.09072, 5000=0.08568 (USD)", Radiation Hardening=No, Stock 1=1405667, Supplier 1=Digi-Key, Termination=SMD/SMT, Thickness=0.022inch, Voltage Rating (DC)=16V, Weight=2.3E-05oz, Width=0.02inch
C3 C5 C7 C9 C10 C23 C26 C27 C30 C31 C32 C33 C34 C35 C36 C37 C38 C45 C46: library part CC0402KRX5R8BB224, "CAP CER 0.22UF 25V X5R 0402", Capacitance=220nF, Case/Package=0402, Dielectric=X5R, LCSC Part Number=C326836, Manufacturer=Yageo, Max Operating Temperature=85°C, Min Operating Temperature=-55°C, Supplier Part Number 1=603-CC402KRX5R8BB224, Tolerance=10%, Voltage Rating=25V, Category="Ceramic Capacitors", ComponentLink1Description=http://www.yageo.com/documents/recent/UPY-GPHC_X5R_4V-to-50V_25.pdf?src-supplier=Digi-Key, ComponentLink1URL=http://www.yageo.com/documents/recent/UPY-GPHC_X5R_4V-to-50V_25.pdf?src-supplier=Digi-Key, ComponentLink2Description=https://www.yageo.com/upload/media/product/productsearch/datasheet/mlcc/UPY-GPHC_X5R_4V-to-50V_26.pdf?src-supplier=Digi-Key, ComponentLink2URL=https://www.yageo.com/upload/media/product/productsearch/datasheet/mlcc/UPY-GPHC_X5R_4V-to-50V_26.pdf?src-supplier=Digi-Key, ComponentLink3Description=http://www.yageo.com/documents/recent/UPY-GPHC_X5R_4V-to-50V_23.pdf?src-supplier=Digi-Key, ComponentLink3URL=http://www.yageo.com/documents/recent/UPY-GPHC_X5R_4V-to-50V_23.pdf?src-supplier=Digi-Key, Halogen Free="Halogen Free", Lead Free="Lead Free", Length=0.039inch, Manufacturer Part Number=CC0402KRX5R8BB224, Mount="Surface Mount", Packaging="Tape and Reel", Pricing 1="1=0.10000, 10=0.03300, 50=0.03300, 100=0.02700, 1000=0.01500, 10000=0.01300 (USD)", RoHS=Yes, RoHS Compliant=Yes, Stock 1=61266, Supplier 1=Mouser, Thickness=0.022inch, Voltage Rating (DC)=25V, Width=0.02inch
C4 C6 C8 C15 C18 C20 C22 C25 C29: library part CC0402KRX5R6BB475, "CAP CER 4.7UF 10V X5R 0402", Case Code (Imperial)=0402, Case Code (Metric)=1005, LCSC Part Number=C326586, Manufacturer=Yageo, Max Operating Temperature=85°C, Min Operating Temperature=-55°C, Supplier Part Number 1=3871698, Tolerance=10%, Voltage Rating=10V, Capacitance=4.7uF, Case/Package=0402, Category="Ceramic Capacitors", ComponentLink1Description=http://www.yageo.com/documents/recent/UPY-GPHC_X5R_4V-to-50V_25.pdf?src-supplier=Digi-Key, ComponentLink1URL=http://www.yageo.com/documents/recent/UPY-GPHC_X5R_4V-to-50V_25.pdf?src-supplier=Digi-Key, Manufacturer Part Number=CC0402KRX5R6BB475, Mount="Surface Mount", Packaging="Cut Tape", Pricing 1="10000=0.02310, 50000=0.02100 (GBP)", RoHS=Yes, RoHS Compliant=Yes, Stock 1=20000, Supplier 1=Farnell
C12 C13 C14 C16 C17 C19 C21 C47 C58 C59: library part CC0402KRX5R8BB104, "CAP CER 0.1UF 25V X5R 0402", Capacitance=100nF, Case Code (Imperial)=0402, Case Code (Metric)=1005, Dielectric=X5R, LCSC Part Number=C106256, Manufacturer=Yageo, Max Operating Temperature=85°C, Min Operating Temperature=-55°C, Resistor Type=Ceramic, Supplier Part Number 1=311-1697-1-ND, Tolerance=10%, Voltage Rating=25V, Case/Package=0402, Category="Ceramic Capacitors", ComponentLink1Description=http://www.mouser.com/ds/2/447/UPY-GPHC_X5R_4V-to-50V_25-1131599.pdf?src-supplier=Mouser, ComponentLink1URL=http://www.mouser.com/ds/2/447/UPY-GPHC_X5R_4V-to-50V_25-1131599.pdf?src-supplier=Mouser, ComponentLink2Description=http://www.yageo.com/documents/recent/UPY-GPHC_X5R_4V-to-50V-16.pdf?src-supplier=Future+Electronics, ComponentLink2URL=http://www.yageo.com/documents/recent/UPY-GPHC_X5R_4V-to-50V-16.pdf?src-supplier=Future+Electronics, ComponentLink3Description=http://www.yageo.com/documents/recent/UPY-GPHC_X5R_4V-to-50V_25.pdf?src-supplier=Digi-Key, ComponentLink3URL=http://www.yageo.com/documents/recent/UPY-GPHC_X5R_4V-to-50V_25.pdf?src-supplier=Digi-Key, Depth=0.5mm, Halogen Free="Halogen Free", Item Type=Capacitor, Lead Free="Lead Free", Length=0.039inch, Manufacturer Part Number=CC0402KRX5R8BB104, Mount="Surface Mount", Packaging="Tape and Reel", Pricing 1="1=0.10000, 10=0.03800, 50=0.02100, 100=0.01710, 500=0.01224, 1000=0.00961, 2500=0.00874, 5000=0.00804 (USD)", RoHS=Yes, RoHS Compliant=Yes, Series=CC, Stock 1=4598218, Supplier 1=Digi-Key, Thickness=0.022inch, Voltage Rating (DC)=25V, Width=0.02inch
C24 C28 C61 C62: library part CC0603MRX5R6BB226, "CAP CER 22UF 10V X5R 0603", Case Code (Imperial)=0603, Case Code (Metric)=1608, Dielectric=X5R, LCSC Part Number=C109447, Manufacturer=Yageo, Max Operating Temperature=85°C, Min Operating Temperature=-55°C, Package Quantity=4000, Supplier Part Number 1=311-1819-1-ND, Tolerance=20%, Voltage Rating=10V, Capacitance=22uF, Case/Package=0603, Category="Ceramic Capacitors", ComponentLink1Description=http://www.mouser.com/ds/2/447/Yageo_UPY-GP_NP0_16V-to-50V_9-358835.pdf?src-supplier=Mouser, ComponentLink1URL=http://www.mouser.com/ds/2/447/Yageo_UPY-GP_NP0_16V-to-50V_9-358835.pdf?src-supplier=Mouser, ComponentLink2Description=http://www.yageo.com/documents/recent/UPY-GPHC_X5R_4V-to-50V_25.pdf?src-supplier=Digi-Key, ComponentLink2URL=http://www.yageo.com/documents/recent/UPY-GPHC_X5R_4V-to-50V_25.pdf?src-supplier=Digi-Key, Halogen Free="Halogen Free", Height=0.8mm, Item Type=Capacitor, Lead Free="Lead Free", Length=0.063inch, Manufacturer Part Number=CC0603MRX5R6BB226, Mount="Surface Mount", Packaging="Tape and Reel", Pricing 1="1=0.68000, 10=0.48000, 50=0.36300, 100=0.31610, 500=0.23416, 1000=0.19903 (USD)", RoHS=Yes, RoHS Compliant=Yes, Stock 1=19628, Supplier 1=Digi-Key, Termination=SMD/SMT, Thickness=0.035inch, Voltage Rating (DC)=10V, Weight=7.1E-05oz, Width=0.8mm
C39 C40 C42 C43: library part GJM1555C1H120GB01D, "CAP CER 12PF 50V C0G/NP0 0402", Case Code (Imperial)=0402, Case Code (Metric)=1005, Dielectric=C0G, LCSC Part Number=C161305, Manufacturer=Murata, Max Operating Temperature=125°C, Min Operating Temperature=-55°C, Package Quantity=10000, Supplier Part Number 1=490-8078-1-ND, Tolerance=2%, Voltage Rating=50V, Capacitance=12pF, Case/Package=0402, Category="Ceramic Capacitors", ComponentLink1Description=https://datasheet.ciiva.com/11608/product-11608208.pdf?src-supplier=Avnet, ComponentLink1URL=https://datasheet.ciiva.com/11608/product-11608208.pdf?src-supplier=Avnet, ComponentLink2Description=https://datasheet.ciiva.com/29542/partnumbering-e-01-29542716.pdf?src-supplier=Digi-Key, ComponentLink2URL=https://datasheet.ciiva.com/29542/partnumbering-e-01-29542716.pdf?src-supplier=Digi-Key, ComponentLink3Description=https://datasheet.ciiva.com/29542/partnumbering-e-01-29542715.pdf?src-supplier=Digi-Key, ComponentLink3URL=https://datasheet.ciiva.com/29542/partnumbering-e-01-29542715.pdf?src-supplier=Digi-Key, ComponentLink4Description=https://datasheet.ciiva.com/29542/partnumbering-e-01-29542717.pdf?src-supplier=Digi-Key, ComponentLink4URL=https://datasheet.ciiva.com/29542/partnumbering-e-01-29542717.pdf?src-supplier=Digi-Key, Construction=Flat, Depth=0.5mm, Height=0.5mm, Lead Free="Lead Free", Length=1mm, Manufacturer Part Number=GJM1555C1H120GB01D, Mount="Surface Mount", Packaging="Tape and Reel", Pricing 1="1=0.18000, 10=0.12600, 50=0.07560, 100=0.06390, 500=0.04370, 1000=0.03865, 2500=0.03698, 5000=0.03361 (USD)", Radiation Hardening=No, RoHS=Yes, RoHS Compliant=Yes, Series=GJM, Stock 1=266975, Supplier 1=Digi-Key, Termination=SMD/SMT, Thickness=0.022inch, Voltage Rating (DC)=50V, Width=0.5mm
C41: library part C3216X5R1A336MTJ00N, "10V 33uF X5R ±20% 1206 ROHS", LCSC Part Number=C342606, Manufacturer=TDK, Package=1206, ComponentLink1Description=https://datasheet.ciiva.com/24216/c3216x5r1a336m160ab-264972-24216176.pdf?src-supplier=Mouser, ComponentLink1URL=https://datasheet.ciiva.com/24216/c3216x5r1a336m160ab-264972-24216176.pdf?src-supplier=Mouser, ComponentLink2Description=https://datasheet.ciiva.com/16482/mlccspec-commercial-general-midvoltage-en-16482550.pdf?src-supplier=Future+Electronics, ComponentLink2URL=https://datasheet.ciiva.com/16482/mlccspec-commercial-general-midvoltage-en-16482550.pdf?src-supplier=Future+Electronics, ComponentLink3Description=https://datasheet.ciiva.com/6253/tdkmlcccaprange-6253132.pdf?src-supplier=Digi-Key, ComponentLink3URL=https://datasheet.ciiva.com/6253/tdkmlcccaprange-6253132.pdf?src-supplier=Digi-Key, ComponentLink4Description=https://datasheet.ciiva.com/6253/tdkmlcccaprange-6253134.pdf?src-supplier=Digi-Key, ComponentLink4URL=https://datasheet.ciiva.com/6253/tdkmlcccaprange-6253134.pdf?src-supplier=Digi-Key, Item Type=Capacitor, Manufacturer Part Number=C3216X5R1A336MTJ00N
C44 C48 C60: library part CL10A106MA8NRNC, "CAP CER 10UF 25V X5R 0603", Case Code (Imperial)=0603, Case Code (Metric)=1608, Dielectric=X5R, LCSC Part Number=C96446, Manufacturer=Samsung, Max Operating Temperature=85°C, Min Operating Temperature=-55°C, Package Quantity=1, Tolerance=20%, Voltage Rating=25V, Capacitance=10uF, Case/Package=0603, Category="Ceramic Capacitors", ComponentLink1Description=https://datasheet.ciiva.com/25766/cl10a106ma8nrnc-25766562.pdf?src-supplier=Digi-Key, ComponentLink1URL=https://datasheet.ciiva.com/25766/cl10a106ma8nrnc-25766562.pdf?src-supplier=Digi-Key, Construction=Flat, Contact Plating=Tin, Lead Free="Lead Free", Length=0.063inch, Manufacturer Part Number=CL10A106MA8NRNC, Mount="Surface Mount", Packaging="Tape and Reel", Pricing 1="4000=0.03753, 8000=0.03700, 16000=0.03595, 24000=0.03515, 32000=0.03383, 40000=0.03304, 400000=0.03225 (USD)", RoHS=Yes, RoHS Compliant=Yes, Series=CL, Supplier 1=Avnet, Supplier Part Number 1=CL10A106MA8NRNC, Termination=Wraparound, Thickness=0.035inch, Width=0.031inch
C49 C50 C51: library part T491A106K016AT, "CAP TANT 10UF 10% 16V 1206", LCSC Part Number=C110055, Manufacturer=KEMET, Supplier Part Number 1=80-T491A106K016, Category="Tantalum Capacitors", ComponentLink1Description=https://datasheet.ciiva.com/34302/1573257-34302505.pdf?src-supplier=Jameco, ComponentLink1URL=https://datasheet.ciiva.com/34302/1573257-34302505.pdf?src-supplier=Jameco, ComponentLink2Description=https://datasheet.ciiva.com/7696/1732745-7696294.pdf?src-supplier=Element14, ComponentLink2URL=https://datasheet.ciiva.com/7696/1732745-7696294.pdf?src-supplier=Element14, ComponentLink3Description=https://datasheet.ciiva.com/12882/kem-t2005-t491-12882730.pdf?src-supplier=Mouser, ComponentLink3URL=https://datasheet.ciiva.com/12882/kem-t2005-t491-12882730.pdf?src-supplier=Mouser, ComponentLink4Description=https://datasheet.ciiva.com/6248/kem-t2005-t491-6248087.pdf?src-supplier=Digi-Key, ComponentLink4URL=https://datasheet.ciiva.com/6248/kem-t2005-t491-6248087.pdf?src-supplier=Digi-Key, ComponentLink5Description=https://datasheet.ciiva.com/6248/kem-t2005-t491-6248088.pdf?src-supplier=Digi-Key, ComponentLink5URL=https://datasheet.ciiva.com/6248/kem-t2005-t491-6248088.pdf?src-supplier=Digi-Key, ComponentLink6Description=https://datasheet.ciiva.com/6248/kem-t2005-t491-6248089.pdf?src-supplier=Digi-Key, ComponentLink6URL=https://datasheet.ciiva.com/6248/kem-t2005-t491-6248089.pdf?src-supplier=Digi-Key, ComponentLink7Description=https://datasheet.ciiva.com/14113/t491serie-eng-tds-14113132.pdf?src-supplier=Distrelec, ComponentLink7URL=https://datasheet.ciiva.com/14113/t491serie-eng-tds-14113132.pdf?src-supplier=Distrelec, ComponentLink8Description=https://datasheet.ciiva.com/14605/70095774-14605543.pdf?src-supplier=Allied+Electronics, ComponentLink8URL=https://datasheet.ciiva.com/14605/70095774-14605543.pdf?src-supplier=Allied+Electronics, ComponentLink9Description=https://datasheet.ciiva.com/14586/70095774-14586694.pdf?src-supplier=Allied+Electronics, ComponentLink9URL=https://datasheet.ciiva.com/14586/70095774-14586694.pdf?src-supplier=Allied+Electronics, ComponentLink10Description=https://datasheet.ciiva.com/39123/kem-t2005-t491-39123278.pdf?src-supplier=Onlinecomponents.com, ComponentLink10URL=https://datasheet.ciiva.com/39123/kem-t2005-t491-39123278.pdf?src-supplier=Onlinecomponents.com, ComponentLink11Description=https://datasheet.ciiva.com/7696/1854511-7696293.pdf?src-supplier=Element14, ComponentLink11URL=https://datasheet.ciiva.com/7696/1854511-7696293.pdf?src-supplier=Element14, ComponentLink12Description=https://datasheet.ciiva.com/7696/1854511-7696295.pdf?src-supplier=Element14, ComponentLink12URL=https://datasheet.ciiva.com/7696/1854511-7696295.pdf?src-supplier=Element14, ComponentLink13Description=https://datasheet.ciiva.com/7696/1446014-7696296.pdf?src-supplier=Element14, ComponentLink13URL=https://datasheet.ciiva.com/7696/1446014-7696296.pdf?src-supplier=Element14, ComponentLink14Description=https://datasheet.ciiva.com/7696/1923792-7696431.pdf?src-supplier=Element14, ComponentLink14URL=https://datasheet.ciiva.com/7696/1923792-7696431.pdf?src-supplier=Element14, ComponentLink15Description=https://datasheet.ciiva.com/29244/458306-da-01-de-kondensator-10uf-3216-10pr-16v-85c-29244588.pdf?src-supplier=Conrad, ComponentLink15URL=https://datasheet.ciiva.com/29244/458306-da-01-de-kondensator-10uf-3216-10pr-16v-85c-29244588.pdf?src-supplier=Conrad, Item Type=Capacitor, Manufacturer Part Number=T491A106K016AT, Pricing 1="1=0.34, 10=0.214, 50=0.214, 100=0.163, 1000=0.118, 10000=0.096 (USD)", RoHS=Yes, Stock 1=340138, Supplier 1=Mouser
C52 C53 C54: library part CC0402KRX5R8BB103, "CAP CER 10000PF 25V X5R 0402", LCSC Part Number=C576726, Manufacturer=Yageo, Supplier Part Number 1=2101932, Category="Ceramic Capacitors", ComponentLink1Description=LCSC, ComponentLink1URL=https://www.lcsc.com/product-detail/Multilayer-Ceramic-Capacitors-MLCC-SMD-SMT_YAGEO-CC0402KRX5R8BB103_C576726.html, Item Type=Capacitor, Manufacturer Part Number=CC0402KRX5R8BB103, Pricing 1="10000=0.00290, 40000=0.00270, 150000=0.00260, 250000=0.00250, 500000=0.00240 (USD)", RoHS=Yes, RoHS Compliant=Yes, Stock 1=140000, Supplier 1="Future Electronics"
C55 C56 C57: library part CC0603KRX5R8BB225, "CAP CER 2.2UF 25V X5R 0603", Case Code (Imperial)=0603, Case Code (Metric)=1608, Dielectric=X5R, LCSC Part Number=C309478, Manufacturer=Yageo, Max Operating Temperature=85°C, Min Operating Temperature=-55°C, Package Quantity=4000, Resistor Type=Ceramic, Supplier Part Number 1=311-1786-1-ND, Tolerance=10%, Voltage Rating=25V, Capacitance=2.2uF, Case/Package=0603, ComponentLink1Description=https://www.verical.com/server-webapp/html/getDatasheet?partID=782757&src-supplier=Verical, ComponentLink1URL=https://www.verical.com/server-webapp/html/getDatasheet?partID=782757&src-supplier=Verical, Depth=0.8mm, Halogen Free="Halogen Free", Item Type=Capacitor, Lead Free="Lead Free", Length=1.6mm, Manufacturer Part Number=CC0603KRX5R8BB225, Mount="Surface Mount", Packaging="Tape and Reel", Pricing 1="1=0.4, 10=0.276, 50=0.1932, 100=0.1656, 500=0.1242, 1000=0.10488 (USD)", Radiation Hardening=No, RoHS Compliant=Yes, Stock 1=687936, Supplier 1=Digi-Key, Termination=SMD/SMT, Thickness=0.037inch, Voltage Rating (DC)=25V, Weight=7.1E-05oz, Width=0.031inch
C64: library part CC0603JRNPO8BN102, "CAP CER 1000PF 25V C0G/NPO 0603", Case Code (Imperial)=0603, Case Code (Metric)=1608, Dielectric=C0G, LCSC Part Number=C309470, Manufacturer=Yageo, Max Operating Temperature=125°C, Min Operating Temperature=-55°C, Package Quantity=1, Supplier Part Number 1=311-1342-1-ND, Tolerance=5%, Voltage Rating=25V, Capacitance=1nF, Case/Package=0603, ComponentLink1Description=http://www.farnell.com/datasheets/1132289.pdf?src-supplier=Element14, ComponentLink1URL=http://www.farnell.com/datasheets/1132289.pdf?src-supplier=Element14, ComponentLink2Description=http://www.farnell.com/datasheets/2213336.pdf?src-supplier=Element14, ComponentLink2URL=http://www.farnell.com/datasheets/2213336.pdf?src-supplier=Element14, ComponentLink3Description=http://www.yageo.com/documents/recent/UPY-GP_NP0_16V-to-50V_16.pdf?src-supplier=Digi-Key, ComponentLink3URL=http://www.yageo.com/documents/recent/UPY-GP_NP0_16V-to-50V_16.pdf?src-supplier=Digi-Key, ComponentLink4Description=http://www.yageo.com/exep/pages/download/literatures/ProductSelectionGuide%202014_Final_2.pdf?src-supplier=Digi-Key, ComponentLink4URL=http://www.yageo.com/exep/pages/download/literatures/ProductSelectionGuide%202014_Final_2.pdf?src-supplier=Digi-Key, ComponentLink5Description=http://www.yageo.com/documents/recent/UPY-GP_NP0_16V-to-50V_8.pdf?src-supplier=Avnet, ComponentLink5URL=http://www.yageo.com/documents/recent/UPY-GP_NP0_16V-to-50V_8.pdf?src-supplier=Avnet, ComponentLink6Description=https://www.verical.com/server-webapp/html/getDatasheet?partID=403523&src-supplier=Verical, ComponentLink6URL=https://www.verical.com/server-webapp/html/getDatasheet?partID=403523&src-supplier=Verical, ComponentLink7Description=http://www.yageo.com/documents/recent/UPY-GP_NP0_16V-to-50V_8.pdf?src-supplier=Avnet+Europe, ComponentLink7URL=http://www.yageo.com/documents/recent/UPY-GP_NP0_16V-to-50V_8.pdf?src-supplier=Avnet+Europe, Construction=Flat, Depth=0.8mm, Height=0.8mm, Item Type=Capacitor, Lead Free="Lead Free", Length=1.6mm, Manufacturer Part Number=CC0603JRNPO8BN102, Mount="Surface Mount", Packaging="Tape and Reel", Pricing 1="1=0.1, 10=0.072, 50=0.0394, 100=0.0322, 500=0.02298, 1000=0.01806 (USD)", Radiation Hardening=No, REACH SVHC=Unknown, RoHS Compliant=Yes, Series=CC, Stock 1=290818, Supplier 1=Digi-Key, Termination=SMD/SMT, Thickness=0.035inch, Voltage Rating (DC)=25V, Width=0.031inch
C65: library part C1608X5R1E475KT000E, "CAP CER, 4.7 µF, 25 V, 0603", Case Code (Imperial)=0603, Case Code (Metric)=1608, Dielectric=X5R, Dielectric Material=Ceramic, LCSC Part Number=C76615, Manufacturer=TDK, Max Operating Temperature=85°C, Min Operating Temperature=-55°C, Package Quantity=4000, Supplier Part Number 1=2220Y1000562GCT-ND, Tolerance=10%, Voltage Rating=25V, Capacitance=4.7uF, Case/Package=0603, Category="Ceramic Capacitors", ComponentLink1Description=https://datasheet.ciiva.com/48587/6print-detail-pdf-phplangenpart-noc1608x5r1e475k080acimp-unit-xmhz-48587141.pdf?src-supplier=Onlinecomponents.com, ComponentLink1URL=https://datasheet.ciiva.com/48587/6print-detail-pdf-phplangenpart-noc1608x5r1e475k080acimp-unit-xmhz-48587141.pdf?src-supplier=Onlinecomponents.com, ComponentLink2Description=https://datasheet.ciiva.com/24216/mlcc-commercial-general-en-24216326.pdf?src-supplier=Mouser, ComponentLink2URL=https://datasheet.ciiva.com/24216/mlcc-commercial-general-en-24216326.pdf?src-supplier=Mouser, ComponentLink3Description=https://datasheet.ciiva.com/48671/mlcc-commercial-general-en-48671304.pdf?src-supplier=Avnet, ComponentLink3URL=https://datasheet.ciiva.com/48671/mlcc-commercial-general-en-48671304.pdf?src-supplier=Avnet, Depth=0.8mm, Height=0.8mm, Item Type=Capacitor, Lead Free="Lead Free", Length=1.6mm, Manufacturer Part Number=C1608X5R1E475KT000E, Mount="Surface Mount", Packaging="Tape and Reel", Pricing 2="100=0.23400, 200=0.21900, 1000=0.20700, 2000=0.18700 (GBP)", REACH SVHC="No SVHC", Resistor Type=Ceramic, RoHS=No, Stock 2=16120, Supplier 1=Digi-Key, Supplier 2=RSComponents, Supplier Part Number 2=9159158P, Termination=SMD/SMT, Thickness=0.039inch, Voltage Rating (DC)=25V, Weight=7.1E-05oz, Width=0.031inch
C66: library part TMK325ABJ476MM-P, "CAP CER 47uF 25V 1210", Case/Package=Ceramic, Dielectric=X5R, LCSC Part Number=C90142, Manufacturer="Taiyo Yuden", Max Operating Temperature=85°C, Min Operating Temperature=-55°C, Supplier Part Number 1=1782936, Tolerance=20%, Capacitance=47uF, Category="Ceramic Capacitors", ComponentLink1Description=http://www.yuden.co.jp/productdata/catalog/en/mlcc_all_e.pdf?src-supplier=Avnet+Asia, ComponentLink1URL=http://www.yuden.co.jp/productdata/catalog/en/mlcc_all_e.pdf?src-supplier=Avnet+Asia, ComponentLink2Description=http://ds.yuden.co.jp/TYCOMPAS/ut/detail.do?productNo=TMK325ABJ476MM-P&fileName=TMK325ABJ476MM-P_SS&mode=specSheetDownload&src-supplier=Digi-Key, ComponentLink2URL=http://ds.yuden.co.jp/TYCOMPAS/ut/detail.do?productNo=TMK325ABJ476MM-P&fileName=TMK325ABJ476MM-P_SS&mode=specSheetDownload&src-supplier=Digi-Key, ComponentLink3Description="https://ds.yuden.co.jp/TYCOMPAS/ut/detail?pn=TMK325ABJ476MM-P &amp;u=M&src-supplier=Digi-Key", ComponentLink3URL="https://ds.yuden.co.jp/TYCOMPAS/ut/detail?pn=TMK325ABJ476MM-P &amp;u=M&src-supplier=Digi-Key", Contact Plating=Tin, Lead Free="Lead Free", Length=3.2mm, Manufacturer Part Number=TMK325ABJ476MM-P, Mount="Surface Mount", Packaging="Tape and Reel", Pricing 1="1000=0.37500 (GBP)", RoHS=Yes, RoHS Compliant=Yes, Stock 1=1000, Supplier 1=RSComponents, Termination=Wraparound
C67: library part CC0603KRX7R9BB222, "CAP CER 2200PF 50V X7R 0603", Case Code (Imperial)=0603, Case Code (Metric)=1608, Dielectric=X7R, Insulation Resistance=10GR, LCSC Part Number=C107082, Manufacturer=Yageo, Max Operating Temperature=125°C, Min Operating Temperature=-55°C, Package Quantity=1, Resistor Type=Ceramic, Supplier Part Number 1=6169509, Tolerance=10%, Voltage=50V, Capacitance=2.2nF, Case/Package=0603, Category="Ceramic Capacitors", ComponentLink1Description=https://datasheet.ciiva.com/23768/1079489-23768004.pdf?src-supplier=Newark, ComponentLink1URL=https://datasheet.ciiva.com/23768/1079489-23768004.pdf?src-supplier=Newark, ComponentLink2Description=https://datasheet.ciiva.com/11788/0900766b8079c870-11788403.pdf?src-supplier=RSComponents, ComponentLink2URL=https://datasheet.ciiva.com/11788/0900766b8079c870-11788403.pdf?src-supplier=RSComponents, ComponentLink3Description=https://datasheet.ciiva.com/26862/getdatasheetpartid-403587-26862854.pdf?src-supplier=Verical, ComponentLink3URL=https://datasheet.ciiva.com/26862/getdatasheetpartid-403587-26862854.pdf?src-supplier=Verical, ComponentLink4Description=https://datasheet.ciiva.com/8033/70765-8033863.pdf?src-supplier=Element14, ComponentLink4URL=https://datasheet.ciiva.com/8033/70765-8033863.pdf?src-supplier=Element14, ComponentLink5Description=https://datasheet.ciiva.com/7978/1489800-7978172.pdf?src-supplier=Element14, ComponentLink5URL=https://datasheet.ciiva.com/7978/1489800-7978172.pdf?src-supplier=Element14, ComponentLink6Description=https://datasheet.ciiva.com/28450/1489800-28450632.pdf?src-supplier=Element14, ComponentLink6URL=https://datasheet.ciiva.com/28450/1489800-28450632.pdf?src-supplier=Element14, ComponentLink7Description=https://datasheet.ciiva.com/155/mlccorderingcode-155921.pdf?src-supplier=Digi-Key, ComponentLink7URL=https://datasheet.ciiva.com/155/mlccorderingcode-155921.pdf?src-supplier=Digi-Key, ComponentLink8Description=https://datasheet.ciiva.com/155/mlccorderingcode-155920.pdf?src-supplier=Digi-Key, ComponentLink8URL=https://datasheet.ciiva.com/155/mlccorderingcode-155920.pdf?src-supplier=Digi-Key, ComponentLink9Description=https://datasheet.ciiva.com/155/mlccorderingcode-155922.pdf?src-supplier=Digi-Key, ComponentLink9URL=https://datasheet.ciiva.com/155/mlccorderingcode-155922.pdf?src-supplier=Digi-Key, ComponentLink10Description=https://datasheet.ciiva.com/8033/1489800-8033864.pdf?src-supplier=Element14, ComponentLink10URL=https://datasheet.ciiva.com/8033/1489800-8033864.pdf?src-supplier=Element14, ComponentLink11Description=https://datasheet.ciiva.com/8033/1489800-8033862.pdf?src-supplier=Element14, ComponentLink11URL=https://datasheet.ciiva.com/8033/1489800-8033862.pdf?src-supplier=Element14, ComponentLink12Description=https://datasheet.ciiva.com/16625/upy-gphc-x7r-6-3v-to-50v-8-16625531.pdf?src-supplier=Avnet+Europe, ComponentLink12URL=https://datasheet.ciiva.com/16625/upy-gphc-x7r-6-3v-to-50v-8-16625531.pdf?src-supplier=Avnet+Europe, Depth=0.8mm, Dissipation Factor=2.5%, Halogen Free="Halogen Free", Height=0.8mm, Item Type=Capacitor, Lead Free="Lead Free", Length=1.6mm, Manufacturer Part Number=CC0603KRX7R9BB222, Mount="Surface Mount", Number of Pins=2, Packaging="Tape and Reel", Pricing 1="4000=0.00500 (USD)", Radiation Hardening=No, REACH SVHC="No SVHC", RoHS=Yes, RoHS Compliant=Yes, Series=CC, Stock 1=1, Supplier 1=RSComponents, Termination=SMD/SMT, Thickness=0.035inch, Voltage Rating=50V, Voltage Rating (DC)=50V, Width=0.031inch
C68: library part GRM1555C1E330JA01D, "CAP CER 33PF 25V C0G/NP0 0402", Case Code (Imperial)=0402, Case Code (Metric)=1005, Dielectric=C0G, LCSC Part Number=C441758, Manufacturer=Murata, Max Operating Temperature=125°C, Min Operating Temperature=-55°C, Package Quantity=1, Supplier Part Number 1=490-6177-1-ND, Tolerance=5%, Voltage=25V, Capacitance=33pF, Case/Package=0402, ComponentLink1Description=https://www.murata.com/~/media/webrenewal/support/library/catalog/products/capacitor/mlcc/c02e.ashx?la=en-us&src-supplier=Digi-Key, ComponentLink1URL=https://www.murata.com/~/media/webrenewal/support/library/catalog/products/capacitor/mlcc/c02e.ashx?la=en-us&src-supplier=Digi-Key, ComponentLink2Description=http://www.mouser.com/ds/2/281/c02e-2905.pdf?src-supplier=Mouser, ComponentLink2URL=http://www.mouser.com/ds/2/281/c02e-2905.pdf?src-supplier=Mouser, ComponentLink3Description=http://psearch.murata.com/capacitor/product/GRM1555C1E330JA01%23.pdf?src-supplier=Avnet, ComponentLink3URL=http://psearch.murata.com/capacitor/product/GRM1555C1E330JA01%23.pdf?src-supplier=Avnet, Construction=Flat, Depth=0.5mm, Height=0.5mm, Item Type=Capacitor, Lead Free="Lead Free", Length=1mm, Manufacturer Part Number=GRM1555C1E330JA01D, Mount="Surface Mount", Packaging="Tape and Reel", Pricing 1="1=0.1, 10=0.034, 50=0.0184, 100=0.0151, 500=0.01078, 1000=0.00847, 2500=0.0077, 5000=0.00708 (USD)", Radiation Hardening=No, RoHS Compliant=Yes, Series=GRM, Stock 1=250773, Supplier 1=Digi-Key, Termination=SMD/SMT, Thickness=0.022inch, Voltage Rating=25V, Voltage Rating (DC)=25V, Width=0.02inch
C69: library part FN18X223K250PSG, "25V 22nF X7R 0603 Multilayer Ceramic Capacitors MLCC - SMD/SMT ROHS", LCSC Part no=C2929161, Package=0603, ComponentLink1Description=LCSC, ComponentLink1URL=https://www.lcsc.com/product-detail/Multilayer-Ceramic-Capacitors-MLCC-SMD-SMT_PSA-Prosperity-Dielectrics-FN18X223K250PSG_C2929161.html, Item Type=Capacitor, Manfacuturer=PSA, Manufacturer Prt no=FN18X223K250PSG
D1 D7: "60V 700mV@1A 1A SMA(DO-214AC) Schottky Barrier Diodes (SBD) ROHS", LCSC Part Number=C2481, Manufacturer=MDD, Package=SMA(DO-214AC), ComponentLink1Description=LCSC, ComponentLink1URL=https://www.lcsc.com/product-detail/Schottky-Barrier-Diodes-SBD_MDD-Microdiode-Electronics-SS16_C2481.html, Item Type="Schottky Diode", Manufacturer Part Number=SS16